# Altium PCB EMBL51537_SC_BOARD.PcbDoc (part 2 of 2)
Units mil, origin at the board's own origin, x right, y up, seen from the top; angles counter-clockwise.
Board outline 4527.6 x 6358.3 mil, 4 copper layers (TOP, L2_PWR, L3_GND, BOTTOM), stack 20.602 mil thick; 126 components, 64 nets, 342 pads, 137 vias.
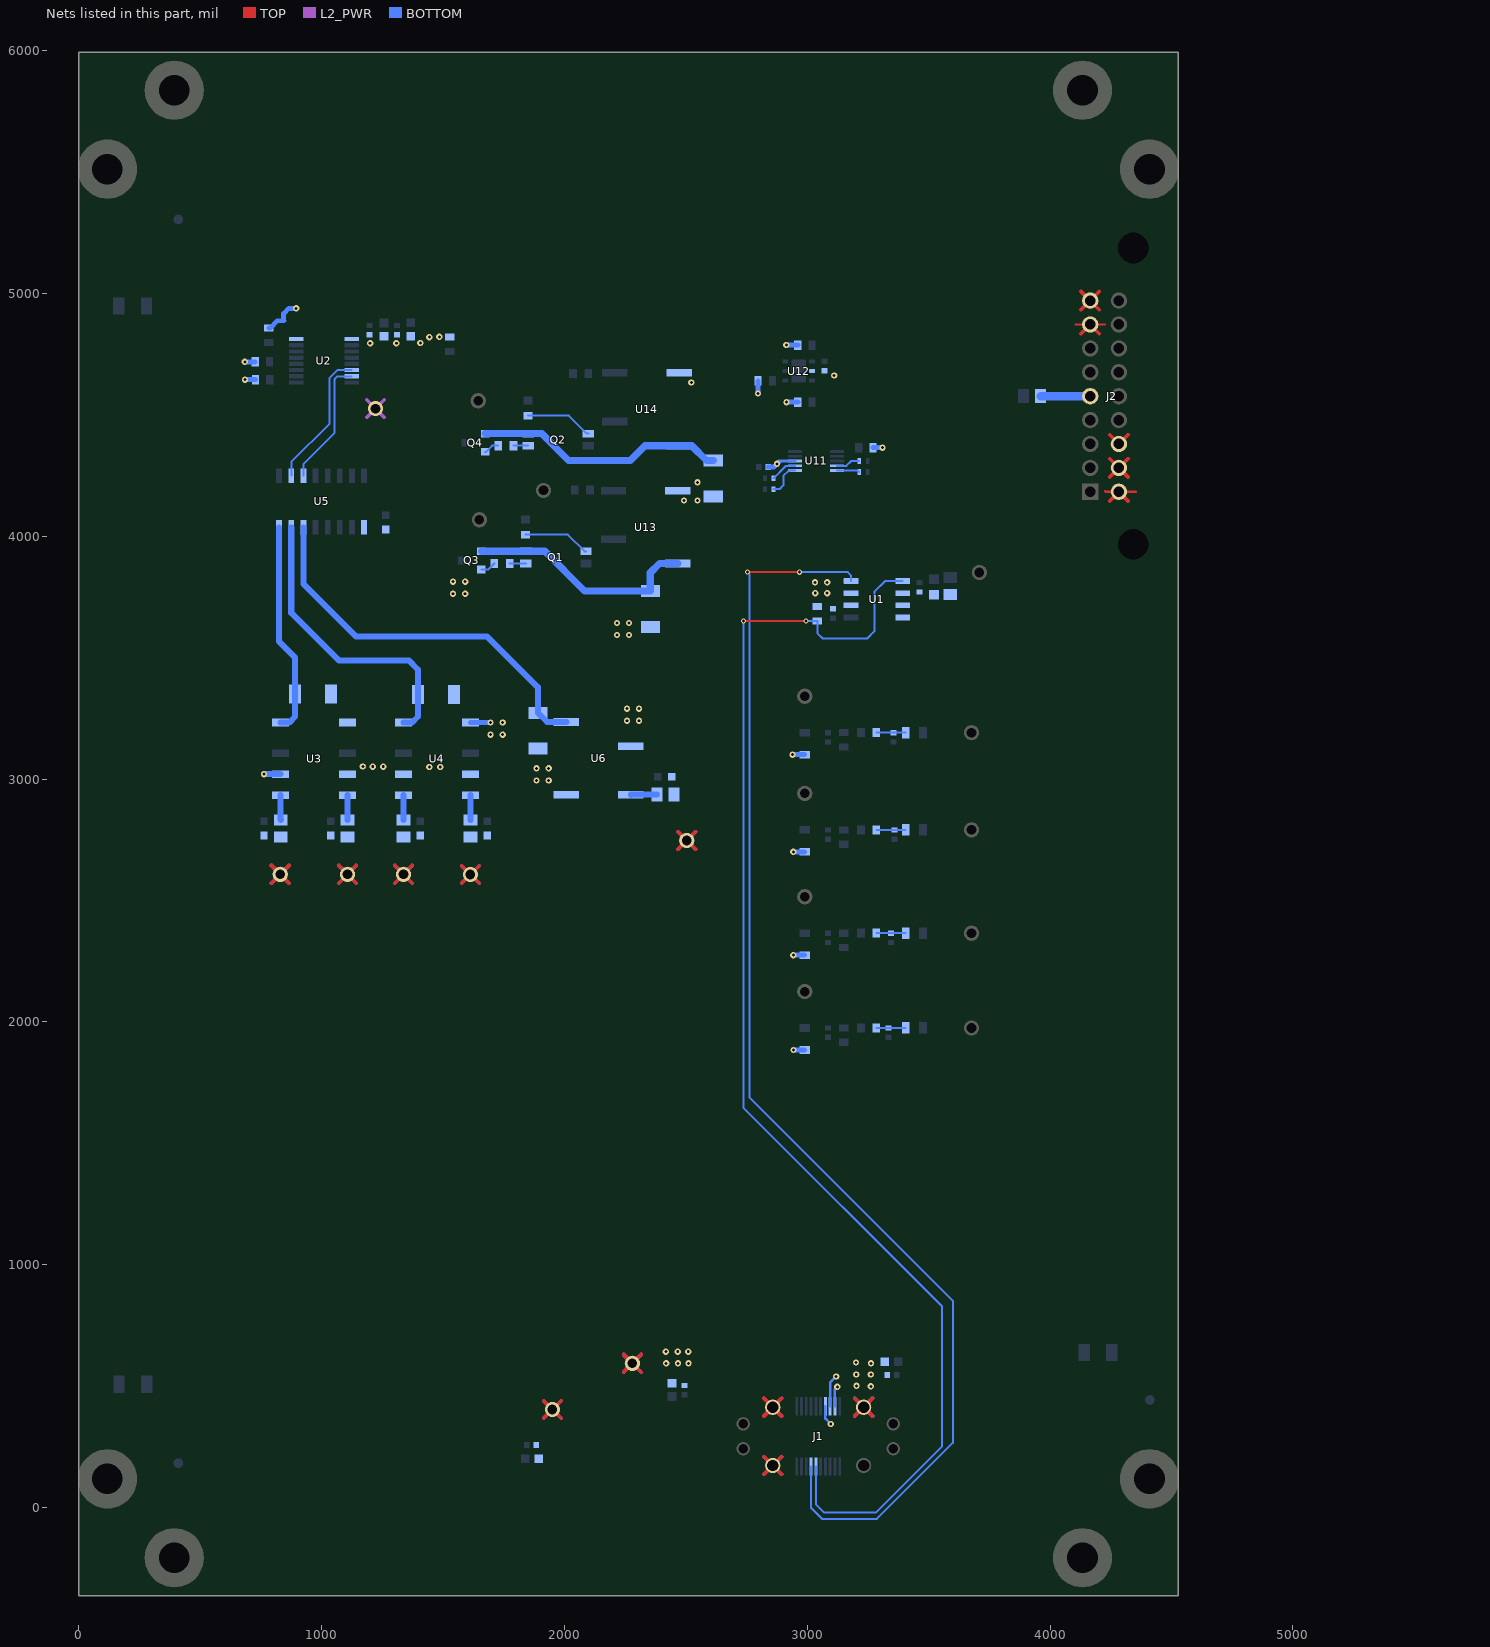
[diagram p4: the nets of this part, all layers, seen from the top]

## Via types
v1: diameter 24/26/26/24 (per signal layer), hole 12, TOP to BOTTOM, 110 vias
v2: diameter 20/22/22/20 (per signal layer), hole 12, TOP to BOTTOM, 27 vias

## Nets (pads, with @x,y where several pads share a name; then routed paths per layer and width w, separated by ;. In a path a pad name is that pad's centre, name@x,y a point inside that pad or via, vN(x,y) a via of type N, cw(c..) or ccw(c..) an arc to the next point about the centre after c; other vN are vias at no path point) (continued)
N03291: U2.6 U5.2 | length 573
  BOTTOM w8.26: U5.2@875.25,4249.4 875.25,4306.25 1033,4464 1033,4652.65 1064.71,4684.36 U2.6@1124.27,4684.36
N03295: U2.7 U5.3 | length 526.5
  BOTTOM w8.26: U5.3@925.25,4249.4 925.25,4296.9 1054,4425.65 1054,4647.65 1065.12,4658.77 U2.7@1124.27,4658.77
N06560: R14.1 U11.7 | length 109.9
  BOTTOM w8.26: R14.1@2861.47,4238.9 2912.78,4290.22 U11.7@2950.13,4290.22
N06575: R13.1 U11.6 | length 143.3
  BOTTOM w8.26: R13.1@2861.47,4193.9 2885.9,4193.9 2902,4210 2902,4249 2923.53,4270.53 U11.6@2950.13,4270.53
N06579: R12.1 U11.5 | length 93
  BOTTOM w8.26: U11.5@3123.36,4270.53 3208.4,4270.53 R12.1@3214.03,4264.9
N06583: R11.1 U11.4 | length 98.8
  BOTTOM w8.26: U11.4@3123.36,4290.22 3161.42,4290.22 3181.11,4309.9 R11.1@3214.03,4309.9
N07201: L26.1 U3.4 | length 101.1
  BOTTOM w25: L26.1@1106.9,2832.43 U3.4@1106.9,2933.49
N07205: L25.1 U3.5 | length 101.4
  BOTTOM w25: U3.5@831.32,2933.49 831.32,2833.22 L25.1@832.1,2832.43
N07536: L23.1 U4.4 | length 101.1
  BOTTOM w25: L23.1@1613.05,2832.43 U4.4@1613.05,2933.49
N07541: L24.1 U4.5 | length 101.1
  BOTTOM w25: L24.1@1337.46,2832.43 U4.5@1337.46,2933.49
N08317: L27.1 U6.4 | length 108.1
  BOTTOM w25: U6.4@2273.88,2935.1 2274.78,2936 L27.1@2381.57,2936
N13136: C2.1 C3.1 L22.1 U1.6 U1.7 U1.8
N15818: D22.2 Q1.4 Q3.2 U13.8 | length 967.7
  BOTTOM w30: Q3.2@1658.37,3937.75 Q1.4@1841.08,3937.75 1920.25,3937.75 2083.18,3774.82 D22.2@2354,3774.82 2354,3850 2391.75,3887.75 U13.8@2467.78,3887.75
N16558: Q1.1 R17.1 | length 277.4
  BOTTOM w8.26: R17.1@1840.1,4006.25 2014.75,4006.25 2083.25,3937.75 Q1.1@2089.11,3937.75
N17913: Q2.1 R19.1 | length 279.5
  BOTTOM w8.26: R19.1@1850.1,4496.25 2018.75,4496.25 2092.25,4422.75 Q2.1@2099.11,4422.75
N17917: D23.2 Q2.4 Q4.2 U14.8 | length 1036.1
  BOTTOM w30: Q4.2@1673.37,4422.75 Q2.4@1851.08,4422.75 1906.25,4422.75 2017.18,4311.82 2270.82,4311.82 2331.75,4372.75 U14.8@2472.78,4372.75 2524.25,4372.75 2585.18,4311.82 D23.2@2613,4311.82
N410547: C18.1 L18.2 R30.1 | length 121.2
  BOTTOM w8.26: R30.1@3284.59,3191.14 C18.1@3355.07,3191.14 L18.2@3405.78,3191.14
N411738: C20.1 L19.2 R32.1 | length 121.2
  BOTTOM w8.26: R32.1@3284.59,2790.75 C20.1@3360.07,2790.75 L19.2@3405.78,2790.75
N412167: C22.1 L20.2 R34.1 | length 121.2
  BOTTOM w8.26: R34.1@3284.59,2365.35 C22.1@3345.07,2365.35 L20.2@3405.78,2365.35
N412611: C24.1 L21.2 R36.1 | length 121.2
  BOTTOM w8.26: R36.1@3284.59,1974.96 C24.1@3335.07,1974.96 L21.2@3405.78,1974.96
N637569: J2.5 L16.2 | length 203.8
  BOTTOM w35: L16.2@3961.61,4576.81 J2.5@4165.39,4576.81
N652017: Q1.3 R38.2 | length 66.6
  BOTTOM w8.26: R38.2@1774.5,3887.75 Q1.3@1841.08,3887.75
N652047: Q2.3 R39.2 | length 60.6
  BOTTOM w8.26: R39.2@1790.5,4372.75 Q2.3@1851.08,4372.75
N652154: Q4.1 R39.1 | length 64.4
  BOTTOM w8.26: Q4.1@1673.37,4347.94 1677.94,4347.94 1702.75,4372.75 R39.1@1727.5,4372.75
N652754: Q3.1 R38.1 | length 63.4
  BOTTOM w8.26: Q3.1@1658.37,3862.94 1686.7,3862.94 R38.1@1711.5,3887.75
RELAY1_OUT1: C26.2 J2.9 L26.2 TP5.1 | length 624.5
  TOP w15: 1070.61,2571.21 TP5.1@1106.9,2607.5 ; 1070.61,2643.79 TP5.1@1106.9,2607.5 ; 1143.2,2571.21 TP5.1@1106.9,2607.5 ; 1143.2,2643.79 TP5.1@1106.9,2607.5 ; 4127.57,4932.69 J2.9@4165.39,4970.51 ; 4127.57,5008.33 J2.9@4165.39,4970.51 ; 4203.21,4932.69 J2.9@4165.39,4970.51 ; 4203.21,5008.33 J2.9@4165.39,4970.51
  BOTTOM w15: 1070.61,2571.21 TP5.1@1106.9,2607.5 ; 1070.61,2643.79 TP5.1@1106.9,2607.5 ; 1143.2,2571.21 TP5.1@1106.9,2607.5 ; 1143.2,2643.79 TP5.1@1106.9,2607.5
RELAY1_OUT2: C27.2 J2.10 L25.2 TP8.1 | length 644.4
  TOP w10: 4228,4185 4229.89,4183.11 J2.10@4283.5,4183.11 4353.89,4183.11 4354,4183
  TOP w15: 793.81,2571.21 TP8.1@830.1,2607.5 ; 793.81,2643.79 TP8.1@830.1,2607.5 ; 866.4,2571.21 TP8.1@830.1,2607.5 ; 866.4,2643.79 TP8.1@830.1,2607.5 ; 4245.69,4145.29 J2.10@4283.5,4183.11 4321.32,4145.29
  BOTTOM w15: 793.81,2571.21 TP8.1@830.1,2607.5 ; 793.81,2643.79 TP8.1@830.1,2607.5 ; 866.4,2571.21 TP8.1@830.1,2607.5 ; 866.4,2643.79 TP8.1@830.1,2607.5
RELAY2_OUT1: C15.2 J2.11 L23.2 TP6.1 | length 624.5
  TOP w15: 1576.75,2570.67 TP6.1@1613.05,2606.96 ; 1576.75,2643.25 TP6.1@1613.05,2606.96 ; 1649.34,2570.67 TP6.1@1613.05,2606.96 ; 1649.34,2643.25 TP6.1@1613.05,2606.96 ; 4245.69,4243.72 J2.11@4283.5,4281.53 ; 4245.69,4319.35 J2.11@4283.5,4281.53 ; 4321.32,4243.72 J2.11@4283.5,4281.53 ; 4321.32,4319.35 J2.11@4283.5,4281.53
  BOTTOM w15: 1576.75,2570.67 TP6.1@1613.05,2606.96 ; 1576.75,2643.25 TP6.1@1613.05,2606.96 ; 1649.34,2570.67 TP6.1@1613.05,2606.96 ; 1649.34,2643.25 TP6.1@1613.05,2606.96
RELAY2_OUT2: C16.2 J2.12 L24.2 TP9.1 | length 517.6
  TOP w15: 1301.16,2571.21 TP9.1@1337.46,2607.5 ; 1301.16,2643.79 TP9.1@1337.46,2607.5 ; 1373.75,2571.21 TP9.1@1337.46,2607.5 ; 1373.75,2643.79 TP9.1@1337.46,2607.5 ; 4245.69,4417.78 J2.12@4283.5,4379.96 4321.32,4417.78
  BOTTOM w15: 1301.16,2571.21 TP9.1@1337.46,2607.5 ; 1301.16,2643.79 TP9.1@1337.46,2607.5 ; 1373.75,2571.21 TP9.1@1337.46,2607.5 ; 1373.75,2643.79 TP9.1@1337.46,2607.5
RELAY3_OUT1: C17.2 J2.8 L27.2 TP7.1 | length 637.6
  TOP w10: 4106,4872 4106.09,4872.09 J2.8@4165.39,4872.09 4225.91,4872.09 4226,4872
  TOP w15: 2467.58,2710.8 TP7.1@2503.87,2747.1 ; 2467.58,2783.39 TP7.1@2503.87,2747.1 ; 2540.17,2710.8 TP7.1@2503.87,2747.1 ; 2540.17,2783.39 TP7.1@2503.87,2747.1 ; 4127.57,4834.27 J2.8@4165.39,4872.09 4203.21,4834.27
  BOTTOM w15: 2467.58,2710.8 TP7.1@2503.87,2747.1 ; 2467.58,2783.39 TP7.1@2503.87,2747.1 ; 2540.17,2710.8 TP7.1@2503.87,2747.1 ; 2540.17,2783.39 TP7.1@2503.87,2747.1
RELAY_1: D24.2 U3.8 U5.16 | length 876.6
  BOTTOM w25: U5.16@825.25,4036.8 825.25,3566.11 891.18,3500.18 D24.2@891.18,3351 891.18,3257.7 866.18,3232.7 U3.8@831.32,3232.7
RELAY_2: D25.2 U4.8 U5.15 | length 1234.2
  BOTTOM w25: U5.15@875.25,4036.8 875.25,3684.75 1071,3489 1359.18,3489 1397.18,3451 D25.2@1397.18,3348 1397.18,3257.7 1372.18,3232.7 U4.8@1337.46,3232.7
RELAY_3: D26.2 U5.14 U6.8 | length 1613.5
  BOTTOM w25: U5.14@925.25,4036.8 925.25,3803.75 1141,3588 1681,3588 1891,3378 D26.2@1891,3272.82 1928.72,3235.1 U6.8@2008.53,3235.1
USB_EN: J1.17 U1.4 | length 5296.5
  TOP w8.26: v2(2754,3853) 2967,3853 v2(2968,3852)
  BOTTOM w8.26: v2(2754,3853) 2761.55,3845.45 2761.55,1689.45 3600,851 3600,266 3287,-47 3061,-47 3015.8,-1.8 J1.17@3015.8,169.28 ; v2(2968,3852) 3167,3852 3180.8,3838.2 U1.4@3180.8,3815.75
USB_OC: J1.16 R1.2 U1.5 | length 5451.3
  TOP w8.26: v2(2737.42,3651) 2995,3651 v2(2995.22,3651.22)
  BOTTOM w8.26: v2(2737.42,3651) 2737.42,1646.58 3556,828 3556,252 3283,-21 3070,-21 3035.49,13.51 J1.16@3035.49,169.28 ; v2(2995.22,3651.22) R1.2@3042.1,3651.22 3042.1,3600.9 3064,3579 3248,3579 3277,3608 3277,3772 3320.75,3815.75 U1.5@3393.4,3815.75
VDD1: C6.2 C9.1 C10.1 D22.1 D23.1 D24.1 D25.1 D26.1 J1.2 J1.P4 TP3.1 U3.1 U4.1 U5.9 U6.2 U6.5 U13.5 U14.5 | length 905
  TOP w15: 1914.45,367.61 TP3.1@1950.75,403.9 ; 1914.45,440.19 TP3.1@1950.75,403.9 ; 1987.04,367.61 TP3.1@1950.75,403.9 ; 1987.04,440.19 TP3.1@1950.75,403.9 ; 2822.03,136.92 J1.P4@2858.32,173.22 ; 2822.03,209.51 J1.P4@2858.32,173.22 ; 2894.61,136.92 J1.P4@2858.32,173.22 ; 2894.61,209.51 J1.P4@2858.32,173.22
  BOTTOM w10: J1.2@3114.22,417.31 3114.22,463 ; 3114.23,463 3114.23,487.23 v1(3124,497)
  BOTTOM w15: 1914.45,367.61 TP3.1@1950.75,403.9 ; 1914.45,440.19 TP3.1@1950.75,403.9 ; 1987.04,367.61 TP3.1@1950.75,403.9 ; 1987.04,440.19 TP3.1@1950.75,403.9 ; 2822.03,136.92 J1.P4@2858.32,173.22 ; 2822.03,209.51 J1.P4@2858.32,173.22 ; 2894.61,136.92 J1.P4@2858.32,173.22 ; 2894.61,209.51 J1.P4@2858.32,173.22
  other v1: 1885.17,2994.1 1935.17,2994.1 1885.17,3044.1 1935.17,3044.1 1696,3182.7 1746,3182.7 1696,3232.7 1746,3232.7 2257.52,3240.1 2307.52,3240.1 2257.52,3290.1 2307.52,3290.1 2216.52,3593.1 2266.52,3593.1 2216.52,3643.1 2266.52,3643.1 1541.52,3763.1 1591.52,3763.1 1541.52,3813.1 1591.52,3813.1 2493,4147 2548,4147 2548,4222 2523,4633
VDD2: C1.1 C11.1 C12.1 J1.3 J1.P2 R1.1 TP2.1 U1.2 U1.3 U3.3 U4.3 U4.6 | length 1159.3
  TOP w15: 2243.8,557.46 TP2.1@2280.1,593.75 ; 2243.8,630.04 TP2.1@2280.1,593.75 ; 2316.39,557.46 TP2.1@2280.1,593.75 ; 2316.39,630.04 TP2.1@2280.1,593.75 ; 2822.03,377.08 J1.P2@2858.32,413.37 ; 2822.03,449.67 J1.P2@2858.32,413.37 ; 2894.61,377.08 J1.P2@2858.32,413.37 ; 2894.61,449.67 J1.P2@2858.32,413.37
  L2_PWR w15: 2243.8,557.46 TP2.1@2280.1,593.75 ; 2243.8,630.04 TP2.1@2280.1,593.75 ; 2316.39,557.46 TP2.1@2280.1,593.75 ; 2316.39,630.04 TP2.1@2280.1,593.75 ; 2822.03,377.08 J1.P2@2858.32,413.37 ; 2822.03,449.67 J1.P2@2858.32,413.37 ; 2894.61,377.08 J1.P2@2858.32,413.37 ; 2894.61,449.67 J1.P2@2858.32,413.37
  BOTTOM w10: J1.3@3094.54,417.31 3094.54,440 3094.54,515.54 v1(3119,540)
  BOTTOM w15: 2243.8,557.46 TP2.1@2280.1,593.75 ; 2243.8,630.04 TP2.1@2280.1,593.75 ; 2316.39,557.46 TP2.1@2280.1,593.75 ; 2316.39,630.04 TP2.1@2280.1,593.75
  other v1: 2419,594 2468,594 2511,594 2418.1,642 2467,642 2510,642 1443.99,3050 1489,3050 1210.99,3051 1254,3051 1170,3052 3033.25,3765.75 3082,3765.75 3032,3810 3082,3810
VDD3: C4.1 C5.1 C7.1 C8.1 C13.1 C14.1 C33.1 C34.1 D18.2 D19.2 D20.2 D21.2 J1.4 J1.P1 R2.1 R3.1 R8.1 R9.1 R10.1 R15.2 R28.1 R29.1 TP4.1 U2.1 U2.16 U3.6 U11.8 U12.5 | length 1720.4
  TOP w15: 3196.04,377.08 J1.P1@3232.34,413.37 ; 3196.04,449.67 J1.P1@3232.34,413.37 ; 3268.63,377.08 J1.P1@3232.34,413.37 ; 3268.63,449.67 J1.P1@3232.34,413.37
  L2_PWR w15: 1185.81,4489.45 TP4.1@1222.1,4525.75 ; 1185.81,4562.04 TP4.1@1222.1,4525.75 ; 1258.39,4489.45 TP4.1@1222.1,4525.75 ; 1258.39,4562.04 TP4.1@1222.1,4525.75 ; 3196.04,377.08 J1.P1@3232.34,413.37 ; 3196.04,449.67 J1.P1@3232.34,413.37 ; 3268.63,377.08 J1.P1@3232.34,413.37 ; 3268.63,449.67 J1.P1@3232.34,413.37
  BOTTOM w10: J1.4@3074.86,417.31 3074.86,397 3074.86,366.14 v1(3097,344)
  BOTTOM w12: v1@2883.5,4305.5 2887.9,4309.9 U11.8@2950.13,4309.9
  BOTTOM w15: 3196.04,377.08 J1.P1@3232.34,413.37 ; 3196.04,449.67 J1.P1@3232.34,413.37 ; 3268.63,377.08 J1.P1@3232.34,413.37 ; 3268.63,449.67 J1.P1@3232.34,413.37
  BOTTOM w20: v1(684,4718.04) R2.1@726.72,4718.04 ; v1(685,4645.1) R28.1@727.72,4645.1 ; R3.1@782.99,4857.28 787.91,4857.28 818.23,4887.6 844.95,4887.6 843.75,4888.79 843.75,4917.08 864.95,4938.28 v1(895.63,4938.28) ; v1(2797.37,4588) R8.1@2797.37,4640.25 ; C7.1@2839.29,4285 2863,4285 v1(2876,4298) v1@2883.5,4305.5 ; v1(2913.9,4787.25) R15.2@2961.37,4787.25 ; v1(2915,4552.25) R9.1@2961.37,4552.25 ; v1(2939.26,3100.59) D18.2@2990.15,3100.59 ; v1(2943,2700.2) D19.2@2990.15,2700.2 ; v1(2943.15,2274.8) D20.2@2990.14,2274.8 ; v1(2943.44,1884.41) D21.2@2990.15,1884.41 ; R10.1@3271.28,4364.9 v1(3310.04,4364.9)
  BOTTOM w25: v1(763,3020.11) U3.6@831.32,3020.11
  other v1: 3262,499 3203,501 3202,548 3262,548 3263,594 3201,597 3111,4662 1200,4794.63 1308,4794.88 1406.66,4796 1444.04,4820.09 1485.03,4821
pads on no net: 40T_GLOBAL_FID. J1.18 J1.19 J1.20 J2. J2.13 U2.4 U2.9 U2.10 U2.11 U2.12 U3.2 U3.7 U4.2 U4.7 U5.4 U5.5 U5.6 U5.7 U5.10 U5.11 U5.12 U5.13

## Polygon pours and split planes (outlines as drawn)
GND on TOP "TOP-GND" (solid, pour order 40): 658,5659 3952,5659 4242.01,5368.99 4242.01,5044.99 4418,4869 4418,4673 4326,4673 4326,4611 4195,4611 4195,4537 4326,4537 4326,4065 4263,4065 4147,3949 4147,3948 4287,3948 4397,3838 4397,2116 4190,1909 4190,466 4008,284 3589,284 3404.87,99.87 3153.85,99.87 3120.92,66.94 ccw(c3123.75,64.11) 3122.71,60.25 cw(c3117,39) 3139,39 cw(c3117,39) 3117,17 cw(c3117,39) 3095.75,33.29 ccw(c3091.89,32.25) 3089.06,35.08 3082.75,28.76 3082.63,28.16 cw(c3063,32) 3043,32.1 ccw(c3039,32.13) 3036.17,34.95 3014.04,12.83 ccw(c3016.87,10) 3016.75,6 3024,4 3010,4 665,6 249,422 249,5250
VDD1 on TOP "TOP-VDD1" (solid, pour order 27): 3141,509 2960,509 2939.5,488.5 2939.5,359 2924.5,344 2791,344 2784,337 2784,238 2784,201 2774,191 2125,191 2118,198 2118,500 2090,528 1916,528 1891,503 1871,483 1871,96 1949,18 2998,18 3028,48 3028,73 3028,109 3028,140 3028,435 3039,446 3136,446 3146,456 3146,477 3146,504
VDD2 on TOP "TOP-VDD2" (solid, pour order 26): 2944,523 3129,523 3137,531 3137,559 3130,566 3016,566 2953,629 2899,683 2229,683 2193,647 2193,461 2255,399 2758,399 2788,369 2797,360 2912,360 2926,374 2926,505
GND on TOP "TOP-GND 1" (solid, pour order 42): 20,-344.17 20,5974.13 4507.6,5974.13 4507.6,-344.17
RELAY3_OUT1 on TOP "TOP-RELAY3_OUT1" (solid, pour order 29): 4225,4910 2621,4910 2366,4655 2366,2690 2403,2653 2568,2653 2634,2719 2634,4645 2807,4818 4224,4818 4240,4834 4240,4895
RELAY2_OUT2 on TOP "TOP-RELAY2_OUT2" (solid, pour order 30): 1297,2519 1487,2519 1507,2539 1507,2659 1538,2690 1868,2690 1930,2628 1930,2514 2004,2440 2026,2418 3154,2418 3264,2528 3264,4000 3660,4396 4203,4396 4252,4347 4352,4347 4371,4366 4371,4506 4350,4527 3520,4527 3060,4067 3060,2672 2993,2605 2641,2605 2335,2605 2259,2681 2259,2763 2217,2805 1347,2805 1277,2735 1277,2539
RELAY1_OUT1 on TOP "TOP-RELAY1_OUT1" (solid, pour order 32): 4190,5055 2145,5055 1961,4871 1961,3811 1961,3143 1810,2992 996,2992 957,2953 957,2652 957,2577 1025,2509 1144,2509 1189,2554 1189,2661 1189,2810 1218,2839 2111,2839 2252,2980 2252,4805 2364,4917 4206,4917 4230,4941 4230,5015
RELAY1_OUT2 on TOP "TOP-RELAY1_OUT2" (solid, pour order 34): 1094,1569 3992,1569 4084,1661 4084,3896 4258,4070 4341,4070 4370,4099 4370,4212 4360,4222 4253,4222 4227,4222 4220,4215 4220,4150 4202,4132 3898,4132 3834,4068 3834,1970 3708,1844 1208,1844 910,2142 910,2678 879.5,2708.5 789.5,2708.5 757,2676 757,1906
VDD3 on TOP "TOP-VDD3" (solid, pour order 24): 3169,457 3147,435 3056,435 3040,419 3040,324 3051,313 3070,313 3277,313 3298,334 3342,378 3342,500 3342,750 3321,771 3187,771 3169,753
RELAY2_OUT1 on TOP "TOP-RELAY2_OUT1" (solid, pour order 31): 1540,2647 1540,2363 1703,2200 3009,2200 3011,2198 3482,2198 3603,2319 3603,3971 3860,4228 4359,4228 4367,4236 4367,4325 4355,4337 3706,4337 3373,4004 3373,2440 3310,2377 2829,2377 2002,2377 1886,2493 1886,2613 1828,2671 1564,2671
GND on L3_GND "L3_GND-GND" (solid, pour order 43): 20,-344.17 20,5974.13 4507.6,5974.13 4507.6,-344.17
GND on L3_GND "L3_GND-GND 1" (solid, pour order 39): 628,5629 3581,5629 4023,5629 4341,5311 4341,5061 4371,5031 4371,4155 4190,3974 4190,309 3887,6 586,6 249,343 249,5250
GND on BOTTOM "BOTTOM-GND" (solid, pour order 5): 3065.1,2337.75 3364.1,2337.75 3367.1,2334.75 3367.1,2293.75 3359.1,2285.75 3066.1,2285.75 3059.1,2292.75 3059.1,2331.75
GND on BOTTOM "BOTTOM-GND 1" (solid, pour order 14): 1358.25,4188.75 1372,4188.75 1377.37,4183.37 1377.37,4076.37 1368,4067 1246,4067 1237.25,4075.75 1237.25,4119 1159,4197.25 1159,4285 1172,4298 1249,4298
HV_GND on BOTTOM "BOTTOM-HV_GND" (solid, pour order 28): 1652,4244 2272.75,4244 2285.87,4230.87 2285.87,4112 2267.87,4094 2062.75,4094 2043,4113.75 1842,4113.75 1841.87,4113.87 1494.13,4113.87 1380,4228 1380,4597 1514.5,4731.5 1622,4731.5 1836.5,4946 3823,4946 3920,4849 3920,4737 3920,4550 3910,4540 3862,4540 3853,4549 3853,4793 3791,4855 2355,4855 2285,4785 2285,4635 2261,4611 1618,4611 1561,4554 1561,4335
VDD1 on BOTTOM "BOTTOM-VDD1" (solid, pour order 10): 2593,4716 2451,4716 2418,4716 2401,4699 2401,4617 2414,4604 2458,4604 2459,4605 2584,4605 2610,4631 2610,4682 2610,4699
VDD2 on BOTTOM "BOTTOM-VDD2" (solid, pour order 20): 1632,3066 1010,3066 996,3052 996,3002 1003,2995 1656,2995 1665,3004 1665,3033 1664.5,3033.5 1664.5,3058.5 1657,3066
VDD1 on BOTTOM "BOTTOM-VDD1 1" (solid, pour order 13): 2529,4240 2387,4240 2372,4225 2372,4152 2395,4129 2520,4129 2656,4129 2662,4135 2662,4231 2653,4240
GND on BOTTOM "BOTTOM-GND 2" (solid, pour order 44): 20,5974.13 4507.6,5974.13 4507.6,-344.17 20,-344.17
GND on BOTTOM "BOTTOM-GND 3" (solid, pour order 1): 2994,4632 2994,4730 2988,4736 2896,4736 2888,4728 2888,4672 2894,4666 2926,4666 2933,4659 2933,4633 2936,4630 2992,4630
VDD3 on BOTTOM "BOTTOM-VDD3" (solid, pour order 0): 3009.9,4694.25 3007.9,4692.25 3007.9,4665.25 3012.9,4660.25 3043,4660.25 3055.25,4648 3120,4648 3125,4653 3125,4691 3121.75,4694.25
RELAY3_OUT1 on BOTTOM "BOTTOM-RELAY3_OUT1" (solid, pour order 21): 2425.18,2799.82 2425.18,3023.19 2434.18,3032.19 2510.18,3032.19 2510.18,3032.18 2589.82,3032.18 2603,3019 2603,2808 2602.5,2807.5 2602.5,2653.5 2580,2631 2449,2631 2425.18,2654.82
GND on BOTTOM "BOTTOM-GND 4" (solid, pour order 41): 4190,1909 4190,309 3887,6 586,6 447.95,144.05 ccw(c410.1,182.75) 371.4,220.6 249,343 249,5250 658,5659 3628,5659 3952,5659 4242.01,5368.99 4242.01,5044.99 4418,4869 4418,4125 4264,3971 4397,3838 4397,2116
VDD3 on BOTTOM "BOTTOM-VDD3 1" (solid, pour order 22): 3341.25,621.75 3341.25,532.1 3341.08,531.92 3341.08,427.08 3271,357 3187,357 3159,385 3159,772 3167,780 3307,780 3341,746 3341.25,745.75
VDD3 on BOTTOM "BOTTOM-VDD3 2" (solid, pour order 12): 1091.17,4803.67 1093.1,4801.75 1167,4801.75 1184.75,4784 1466,4784 1482,4800 1565,4800 1572,4807 1572,4842 1562,4852 1422,4852 1412.75,4842.75 1135,4842.75 1134.63,4842.37 1103.72,4842.37 1091.17,4829.82
GND on BOTTOM "BOTTOM-GND 5" (solid, pour order 6): 3065.1,3163.75 3370.1,3163.75 3373.1,3160.75 3373.1,3116.75 3368.1,3111.75 3064.1,3111.75 3061.1,3114.75 3061.1,3159.75
GND on BOTTOM "BOTTOM-GND 6" (solid, pour order 3): 3445,3910.75 3542,3910.75 3547.75,3905 3548,3905 3548,3803 3541.5,3796.5 3442.5,3796.5 3439,3800 3439,3873 3439,3904.75
RELAY2_OUT1 on BOTTOM "BOTTOM-RELAY2_OUT1" (solid, pour order 18): 1551.18,2552.82 1551.18,2776.19 1560.18,2785.19 1636.18,2785.19 1636.18,2785.18 1715.82,2785.18 1729,2772 1729,2561 1706,2538 1566,2538
"+5V USB" on BOTTOM "BOTTOM-+5V USB" (solid, pour order 25): 3569.85,3806 3565.6,3810.25 3565.6,3927.97 3565.6,4270.6 3620,4325 4202,4325 4217,4310 4217,4255 4196,4234 3856,4234 3791.68,4169.68 3791.68,3915.07 3791.68,3804.68 3769,3782 3658,3782 3634,3806
N13136 on BOTTOM "BOTTOM-N13136" (solid, pour order 15): 3349.44,3782.09 3624.1,3782.09 3624.1,3670.75 3599.1,3645.75 3356.1,3645.75 3344.1,3657.75 3344.1,3776.75
VDD3 on BOTTOM "BOTTOM-VDD3 3" (solid, pour order 8): 954,4970 861,4970 822,4931 822,4808 831,4799 925,4799 930,4804 930,4820 905,4845 905,4908 914,4917 957,4917 965,4925 965,4959
GND on BOTTOM "BOTTOM-GND 7" (solid, pour order 4): 3062.1,1946.75 3357.1,1946.75 3361.1,1942.75 3361.1,1899.75 3356.1,1894.75 3061.1,1894.75 3055.1,1900.75 3055.1,1939.75
VDD2 on BOTTOM "BOTTOM-VDD2 1" (solid, pour order 23): 2252.05,492.95 2252.1,493 2526,493 2539.95,506.95 2544,511 2544,659 2544,699 2527,716 2178,716 2160,698 2160,690 2160,513 2180.05,492.95
GND on BOTTOM "BOTTOM-GND 8" (solid, pour order 7): 3057.1,2762.75 3374.1,2762.75 3378.1,2758.75 3378.1,2717.75 3371.1,2710.75 3055.1,2710.75 3052.1,2713.75 3052.1,2757.75
RELAY1_OUT2 on BOTTOM "BOTTOM-RELAY1_OUT2" (solid, pour order 17): 747.18,2555.82 747.18,2779.19 756.18,2788.19 832.18,2788.19 832.18,2788.18 911.82,2788.18 925,2775 925,2564 902,2541 762,2541
RELAY2_OUT2 on BOTTOM "BOTTOM-RELAY2_OUT2" (solid, pour order 19): 1267.18,2553.82 1267.18,2777.19 1276.18,2786.19 1352.18,2786.19 1352.18,2786.18 1431.82,2786.18 1445,2773 1445,2562 1422,2539 1282,2539
RELAY1_OUT1 on BOTTOM "BOTTOM-RELAY1_OUT1" (solid, pour order 16): 999.18,2562.82 999.18,2786.19 1008.18,2795.19 1084.18,2795.19 1084.18,2795.18 1163.82,2795.18 1177,2782 1177,2571 1154,2548 1014,2548
VDD1 on BOTTOM "BOTTOM-VDD1 2" (solid, pour order 33): 1971,15 1870,116 1870,3028 1750,3148 987,3148 965,3170 965,3392 995,3422 1176,3422 1234,3364 1234,3234 1266,3202 1476,3202 1502,3228 1502,3386 1514,3398 1514,3398.5 1640,3398.5 1640.5,3399 1775,3399 1806,3368 1806,3220 1853,3173 2078,3173 2108,3203 2108,3440 1928,3620 1191,3620 1163,3648 1163,4070 1170,4077 1206,4077 1234,4049 1500,4049 1517,4032 1517,3862 1549,3830 1978,3830 2145,3663 2405,3663 2422,3646 2422,3109 2404,3091 2211,3091 2142,3022 2142,185 2233,94 2772,94 2796,118 2796,220 2821,245 2906,245 2932,219 2932,68 2879,15
GND on BOTTOM "BOTTOM-GND 9" (solid, pour order 9): 1230.35,4954 1394,4954 1412,4936 1412,4875 1393,4856 1177.85,4856 1177.1,4856.75 1177.1,4900.75
GND on BOTTOM "BOTTOM-GND 10" (solid, pour order 2): 3140,3677.75 3221,3677.75 3226.37,3672.37 3226.37,3606 3089.25,3606 3086.25,3609 3086.25,3668 3091.25,3673 3130,3673 3135.25,3673
VDD2 on BOTTOM "BOTTOM-VDD2 2" (solid, pour order 11): 3216.1,3782.75 3141,3782.75 3129,3794.75 3129,3828 3121,3836 3016,3836 3008.1,3828.1 3008.1,3761.75 3008.1,3700.75 3019.1,3689.75 3209.1,3689.75 3223.1,3703.75 3223.1,3775.75
12V_START1 on L2_PWR "L2_PWR-12V_START1" (solid, pour order 36): 3776,3588 3776,4688 3817,4729 4207,4729 4231,4705 4231,4634 4211,4614 4107,4614 4074,4581 4074,916 4074,529 3821.5,276.5 3599.5,276.5 3553,230 3553,-16 3495,-74 3118,-74 3082,-38 3082,30 3356,304 3356,3168
VDD3 on L2_PWR "L2_PWR-VDD3" (solid, pour order 38): 560,5676 3290,5676 3669,5297 3669,3622 3337,3290 3337,316 2924,-97 1219,-97 337,785 337,5453
VDD1 on L2_PWR "L2_PWR-VDD1" (solid, pour order 35): 1535,3008 1579,2964 2408,2964 2577,3133 2577,4836 2487,4926 2431,4926 2430,4925 1642.44,4925 1602.44,4885 1535,4817.56
VDD2 on L2_PWR "L2_PWR-VDD2" (solid, pour order 37): 1497,3083 955,3083 938,3066 938,848 1328,458 2674,458 2775,357 2959,357 3137,535 3137,1753 3077,1813 2897,1813 2872,1838 2872,3148 3152,3428 3152,3969 3123,3998 2626,3998 2610,3982 2610,3127 2420,2937 1564,2937 1514,2987 1514,3066

## Keep-outs
BOTTOM:
  region: 3560,-354 3963,-354 3963,158.94 3560,158.94
Multi-Layer:
  region: 3561,-354 3963,-354 3963,158.94 3561,158.94
  region: 1826.92,5136 3913.54,5136 3913.54,6001 1826.92,6001
  region: 3674.93,50.66 3674.93,-9.32 3772.64,-9.32 3772.64,50.55 3766.97,50.55 3766.8,50.72 3766.8,157.62 3765.07,159.35 3682.21,159.35 3680.85,157.99 3680.85,50.74 3680.77,50.66

## Other copper
TOP:
  region net CHASSIS_GND: 4179.52,5974.13 4507.6,5974.13 4507.6,5616.93 cw(c4503.6,5616.93) 4500.93,5613.95 ccw(c4409.5,5511.86) 4409.5,5648.91 ccw(c4409.5,5511.86) 4409.5,5374.81 ccw(c4409.5,5511.86) 4500.93,5409.77 cw(c4503.6,5406.79) 4507.6,5406.79 4507.6,223.17 cw(c4503.6,223.17) 4500.93,220.19 ccw(c4409.5,118.1) 4409.5,255.15 ccw(c4409.5,118.1) 4409.5,-18.95 ccw(c4409.5,118.1) 4500.93,16 cw(c4503.6,13.03) 4507.6,13.03 4507.6,-344.17 4179.52,-344.17 cw(c4179.52,-340.17) 4178.23,-336.39 ccw(c4133.91,-206.7) 4270.96,-206.7 ccw(c4133.91,-206.7) 3996.86,-206.7 ccw(c4133.91,-206.7) 4089.59,-336.39 cw(c4088.29,-340.17) 4088.29,-344.17 3963,-344.17 3963,158.94 3765.48,158.94 3765.07,159.35 3682.21,159.35 3681.8,158.94 3561,158.94 3561,-344.17 439.3,-344.17 cw(c439.3,-340.17) 438.01,-336.39 ccw(c393.69,-206.7) 530.74,-206.7 ccw(c393.69,-206.7) 256.64,-206.7 ccw(c393.69,-206.7) 349.37,-336.39 cw(c348.07,-340.17) 348.07,-344.17 20,-344.17 20,13.03 cw(c24,13.03) 26.67,16 ccw(c118.1,118.1) 118.1,-18.95 ccw(c118.1,118.1) 118.1,255.15 ccw(c118.1,118.1) 26.67,220.19 cw(c24,223.17) 20,223.17 20,5406.79 cw(c24,5406.79) 26.67,5409.77 ccw(c118.1,5511.86) 118.1,5374.81 ccw(c118.1,5511.86) 118.1,5648.91 ccw(c118.1,5511.86) 26.67,5613.95 cw(c24,5616.93) 20,5616.93 20,5974.13 348.07,5974.13 cw(c348.07,5970.13) 349.37,5966.34 ccw(c393.69,5836.66) 256.64,5836.66 ccw(c393.69,5836.66) 530.74,5836.66 ccw(c393.69,5836.66) 438.01,5966.34 cw(c439.3,5970.13) 439.3,5974.13 1826.92,5974.13 1826.92,5687.28 646.28,5687.28 220.72,5261.72 220.72,410.29 653.27,-22.27 3009.99,-24.28 3024,-24.28 3026.68,-4.47 cw(c3028.67,-4.74) 3030.03,-3.28 ccw(c3063,32) 3085.61,-10.66 ccw(c3100.62,5.42) 3100.62,-16.58 ccw(c3100.62,5.42) 3114.98,-11.24 ccw(c3116.99,39) 3117,-11.28 ccw(c3117,39) 3167.28,39 ccw(c3117,39) 3159.64,65.66 3165.57,71.59 3416.58,71.59 3600.72,255.72 4019.72,255.72 4040.86,276.87 4041,276.87 ccw(c4041,291) 4050.99,281.01 4201.99,432.01 ccw(c4192,442) 4206.13,442 4206.13,442.13 4218.28,454.29 4218.28,1897.29 4425.28,2104.28 4425.28,3509.3 4443.99,3528.01 ccw(c4434,3538) 4448.13,3538 4448.13,4526 ccw(c4434,4526) 4443.99,4535.99 4354.28,4625.7 4354.28,4644.72 4446.28,4644.72 4446.28,4880.72 4270.3,5056.7 4270.3,5167.71 ccw(c4342.56,5187.05) 4270.3,5206.38 4270.3,5380.7 3963.72,5687.28 3913.54,5687.28 3913.54,5974.13 4088.29,5974.13 cw(c4088.29,5970.13) 4089.59,5966.34 ccw(c4133.91,5836.66) 3996.86,5836.66 ccw(c4133.91,5836.66) 4270.96,5836.66 ccw(c4133.91,5836.66) 4178.23,5966.34 cw(c4179.52,5970.13)
  text "L1" at 4026,5421.5 h35
L2_PWR:
  text "L2" at 4026,5421.5 h35
L3_GND:
  region net CHASSIS_GND: 13 vertices and 4 holes, not listed, extent 20,-344.17 3561,5974.13
  region net CHASSIS_GND: 19 vertices and 4 holes, not listed, extent 3913.54,-344.17 4507.6,5974.13
  text "L3" at 4026,5421.5 h35
BOTTOM:
  pour cut-out: 400,5548 578,5726 3951,5726 4215,5462 4215,5459 4428,5246 4428,4862.36 ccw(c4432,4862.36) 4432,4858.36 cw(c4432,4854.36) 4434.83,4857.19 4441.87,4850.15 4441.87,4798.77 cw(c4437.87,4798.78) 4435.04,4795.95 4434.83,4796.16 ccw(c4432,4793.33) 4428,4793.33 4428,3872.67 ccw(c4432,3872.67) 4434.83,3869.84 4435.04,3870.05 cw(c4437.87,3867.23) 4441.87,3867.23 4441.87,3820.85 4434.83,3813.81 cw(c4432,3816.64) 4432,3812.64 ccw(c4432,3808.64) 4428,3808.64 4428,2133 4429,2133 4429,2071 4215,1857 4215,300 3963,48 3963,-55 531,-55 191,285 191,5340 399,5548
  region net CHASSIS_GND: 439.3,5974.13 1826.92,5974.13 1826.92,5726 578,5726 400,5548 399,5548 191,5340 191,285 531,-55 3049.01,-55 3051.01,-56.99 ccw(c3061,-47) 3061,-61.13 3287,-61.13 ccw(c3287,-47) 3296.99,-56.99 3298.99,-55 3560,-55 3560,-344.17 439.3,-344.17 cw(c439.3,-340.17) 438.01,-336.39 ccw(c393.69,-206.7) 530.74,-206.7 ccw(c393.69,-206.7) 256.64,-206.7 ccw(c393.69,-206.7) 349.37,-336.39 cw(c348.07,-340.17) 348.07,-344.17 20,-344.17 20,13.03 cw(c24,13.03) 26.67,16 ccw(c118.1,118.1) 118.1,-18.95 ccw(c118.1,118.1) 118.1,255.15 ccw(c118.1,118.1) 26.67,220.19 cw(c24,223.17) 20,223.17 20,5406.79 cw(c24,5406.79) 26.67,5409.77 ccw(c118.1,5511.86) 118.1,5374.81 ccw(c118.1,5511.86) 118.1,5648.91 ccw(c118.1,5511.86) 26.67,5613.95 cw(c24,5616.93) 20,5616.93 20,5974.13 348.07,5974.13 cw(c348.07,5970.13) 349.37,5966.34 ccw(c393.69,5836.66) 256.64,5836.66 ccw(c393.69,5836.66) 530.74,5836.66 ccw(c393.69,5836.66) 438.01,5966.34 cw(c439.3,5970.13)
  region net CHASSIS_GND: 4179.52,5974.13 4507.6,5974.13 4507.6,5616.93 cw(c4503.6,5616.93) 4500.93,5613.95 ccw(c4409.5,5511.86) 4409.5,5648.91 ccw(c4409.5,5511.86) 4409.5,5374.81 ccw(c4409.5,5511.86) 4500.93,5409.77 cw(c4503.6,5406.79) 4507.6,5406.79 4507.6,223.17 cw(c4503.6,223.17) 4500.93,220.19 ccw(c4409.5,118.1) 4409.5,255.15 ccw(c4409.5,118.1) 4409.5,-18.95 ccw(c4409.5,118.1) 4500.93,16 cw(c4503.6,13.03) 4507.6,13.03 4507.6,-344.17 4179.52,-344.17 cw(c4179.52,-340.17) 4178.23,-336.39 ccw(c4133.91,-206.7) 4270.96,-206.7 ccw(c4133.91,-206.7) 3996.86,-206.7 ccw(c4133.91,-206.7) 4089.59,-336.39 cw(c4088.29,-340.17) 4088.29,-344.17 3963,-344.17 3963,48 4215,300 4215,1857 4429,2071 4429,2133 4428,2133 4428,3767.01 4465.99,3805.01 ccw(c4456,3815) 4470.13,3815 4470.13,4856 ccw(c4456,4856) 4465.99,4865.99 4428,4903.98 4428,5246 4215,5459 4215,5462 3951,5726 3913.54,5726 3913.54,5974.13 4088.29,5974.13 cw(c4088.29,5970.13) 4089.59,5966.34 ccw(c4133.91,5836.66) 3996.86,5836.66 ccw(c4133.91,5836.66) 4270.96,5836.66 ccw(c4133.91,5836.66) 4178.23,5966.34 cw(c4179.52,5970.13) hole: 4462.44,443 4460.69,456.31 4455.55,468.72 4447.37,479.37 4436.72,487.55 4424.31,492.69 4411,494.44 4397.69,492.69 4385.28,487.55 4385.28,487.55 4374.63,479.37 4366.45,468.72 4361.31,456.31 4359.56,443 4361.31,429.69 4366.45,417.28 4374.63,406.63 4385.28,398.45 4385.28,398.45 4397.69,393.31 4411,391.56 4424.31,393.31 4436.72,398.45 4447.37,406.63 4455.55,417.28 4460.69,429.69 4462.44,443
  region net 12V_START1: 3069,173 3069,60 3083,46 3083,2 3091,-6 3125,-6 3135,4 3135,45 3132,48 3126,54 3111,54 3081,84 3081,173 3078,176 3072,176
  text "L4" at 4095,5421.5 h35
Multi-Layer:
  lines w1: 20,-344.17 20,5974.13 ; 20,-344.17 4507.6,-344.17 ; 20,-344.17 20,5974.13 ; 20,-344.17 4507.6,-344.17 ; 20,5974.13 4507.6,5974.13 ; 20,5974.13 4507.6,5974.13 ; 4507.6,-344.17 4507.6,5974.13 ; 4507.6,-344.17 4507.6,5974.13

## Silkscreen, mask and mechanical layers (free items; w line width, h text height)
DESIGN_OUTLINE:
  lines w1: 0,-364.17 4527.6,-364.17 4527.6,5994.13 0,5994.13 0,-364.17
  lines w15: -17699.9,-1047.25 -16949.9,-1047.25 ; -17699.9,4452.75 -16949.9,4452.75 ; -17699.9,9952.75 -16949.9,9952.75 ; -13699.9,-6397.25 -13699.9,-6047.25 ; -13699.9,14952.75 -13699.9,15302.75 ; -9449.9,-6397.25 -9449.9,-6047.25 ; -9449.9,14952.75 -9449.9,15302.75 ; -5199.9,-6397.25 -5199.9,-6047.25 ; -5199.9,14952.75 -5199.9,15302.75 ; -949.9,-6397.25 -949.9,-6047.25 ; -949.9,14952.75 -949.9,15277.75 ; 3300.1,-6397.25 3300.1,-6047.25 ; 3300.1,14952.75 3300.1,15302.75 ; 7550.1,-6397.25 7550.1,-6047.25 ; 7550.1,14952.75 7550.1,15302.75 ; 11800.1,-6397.25 11800.1,-6047.25 ; 11800.1,14952.75 11800.1,15302.75 ; 15050.1,-1047.25 15800.1,-1047.25 ; 15050.1,4452.75 15800.1,4452.75 ; 15050.1,9952.75 15800.1,9952.75 ; -17949.9,-6547.25 16050.1,-6547.25 16050.1,15452.75 -17949.9,15452.75 -17949.9,-6547.25
  lines w30: -16949.9,-6047.25 -16949.9,14952.75 15050.1,14952.75 15050.1,-6047.25 -16949.9,-6047.25
  text "8" at -15924.9,15077.75 h250
  text "7" at -11674.9,15077.75 h250
  text "6" at -7424.9,15077.75 h250
  text "5" at -3174.9,15077.75 h250
  text "4" at 1075.1,15077.75 h250
  text "3" at 5325.1,15077.75 h250
  text "2" at 9550.1,15077.75 h250
  text "1" at 13825.1,15077.75 h250
  text "D" at -17549.9,12702.75 h250
  text "D" at 15450.1,12702.75 h250
  text "C" at -17549.9,7202.75 h250
  text "C" at 15353.1,6487.75 h250
  text "B" at -17549.9,1727.75 h250
  text "B" at 15450.1,1702.75 h250
  text "A" at 15450.1,-3772.25 h250
  text "A" at -17549.9,-3797.25 h250
  text "8" at -15899.9,-6397.25 h250
  text "7" at -11674.9,-6397.25 h250
  text "6" at -7424.9,-6397.25 h250
  text "5" at -3174.9,-6397.25 h250
  text "4" at 1075.1,-6397.25 h250
  text "3" at 5325.1,-6397.25 h250
  text "CAD" at 6700.1,-6397.25 h188
  text "DATA" at 7700.1,-6397.25 h188
  text "2" at 9575.1,-6397.25 h250
  text "DO NOT MANUALLY" at 10600.1,-6397.25 h188
  text "1" at 13825.1,-6397.25 h250
  text "UPDATE" at 14375.1,-6397.25 h188
DIMENSION:
  drawing of 200 lines, arcs and shapes, not listed
NCLEGEND-1-4:
  circle w1: c8138.5,4445 r19.68
  circle w1: c8138.5,3445 r47.24
  circle w1: c8138.5,3945 r19.68
  circle w1: c8138.5,3695 r62.99
  lines w1: 7689,3570 14664,3570 ; 7689,3820 14664,3820 ; 7689,4070 14664,4070 ; 7689,4320 14664,4320 ; 7689,4570 14664,4570 ; 7689,4820 14664,4820 ; 7689,5070 14664,5070 ; 7689,5320 14664,5320 ; 8588,3320 8588,5070 ; 10603,3320 10603,5070 ; 12618,3320 12618,5070 ; 13889,3320 13889,5070 ; 7689,3320 7689,5570 14664,5570 14664,3320 7689,3320 ; 8116.85,4173.35 8138.5,4216.65 8160.15,4173.35 8116.85,4173.35 ; 8132.5,4689 8144.5,4689 8144.5,4701 8132.5,4701 8132.5,4689
  text "DRILL CHART: TOP to BOTTOM" at 9876.5,5382.5 h125
  text "ALL UNITS ARE IN MILS" at 10126.5,5132.5 h125
  text "FIGURE" at 7838.5,4882.5 h125
  text "FINISHED_SIZE" at 8945.5,4882.5 h125
  text "TOLERANCE_DRILL" at 10860.5,4882.5 h125
  text "PLATED" at 12953.5,4882.5 h125
  text "QTY" at 14126.5,4882.5 h125
  text "12.0" at 9395.5,4632.5 h125
  text "+3.0/-3.0" at 11160.5,4632.5 h125
  text "PLATED" at 12953.5,4632.5 h125
  text "137" at 14126.5,4632.5 h125
  text "39.37" at 9345.5,4382.5 h125
  text "+3.0/-3.0" at 11160.5,4382.5 h125
  text "PLATED" at 12953.5,4382.5 h125
  text "24" at 14176.5,4382.5 h125
  text "43.307" at 9295.5,4132.5 h125
  text "+3.0/-3.0" at 11160.5,4132.5 h125
  text "PLATED" at 12953.5,4132.5 h125
  text "18" at 14176.5,4132.5 h125
  text "47.244" at 9295.5,3882.5 h125
  text "+3.0/-3.0" at 11160.5,3882.5 h125
  text "PLATED" at 12953.5,3882.5 h125
  text "4" at 14226.5,3882.5 h125
  text "125.984" at 9245.5,3632.5 h125
  text "+3.0/-3.0" at 11160.5,3632.5 h125
  text "PLATED" at 12953.5,3632.5 h125
  text "8" at 14226.5,3632.5 h125
  text "125.984" at 9245.5,3382.5 h125
  text "+2.0/-2.0" at 11160.5,3382.5 h125
  text "NON-PLATED" at 12753.5,3382.5 h125
  text "2" at 14226.5,3382.5 h125
DXF_20210528-01:
  drawing of 1150 lines, arcs and shapes, not listed
DXF_CR_0129:
  drawing of 227 lines, arcs and shapes, not listed
FAB_NOTES_SHT2:
  lines w1: 6831,8743 8311,8743 ; 6850,9268 6850,8793 ; 6860,10400 8340,10400 ; 6868,9982 6868,10345.75 ; 6850,8793 6825,8943 6875,8943 6850,8793 ; 6843,10222 6868,10372 6893,10222 6843,10222
  lines w10: 8403,8550 8478,8550 ; 8403,10575 8478,10575 ; 8528,8550 8603,8550 ; 8528,10575 8603,10575 ; 8653,8550 8728,8550 ; 8653,10575 8728,10575 ; 8778,8550 8853,8550 ; 8778,10575 8853,10575 ; 8903,8550 8978,8550 ; 8903,10575 8978,10575 ; 9004,11108 9004,10911 9115,10911 ; 9028,8550 9103,8550 ; 9028,10575 9103,10575 ; 9153,8550 9228,8550 ; 9153,10575 9228,10575 ; 9174,10911 9174,11075 9202,11108 9257,11108 9285,11075 9285,10911 ; 9174,11009 9285,11009 ; 9278,8550 9353,8550 ; 9278,10575 9353,10575 ; 9344,11108 9400,11009 ; 9400,10911 9400,11009 ; 9403,8550 9478,8550 ; 9403,10575 9478,10575 ; 9455,11108 9400,11009 ; 9514,11009 9597,11009 ; 9528,8550 9603,8550 ; 9528,10575 9603,10575 ; 9625,10911 9514,10911 9514,11108 9625,11108 ; 9653,8550 9728,8550 ; 9653,10575 9728,10575 ; 9684,10911 9684,11108 9767,11108 9795,11075 9795,11042 9767,11009 9684,11009 ; 9712,11009 9795,10911 ; 9778,8550 9853,8550 ; 9778,10575 9853,10575 ; 10051,10979 10079,10946 10134,10946 10162,10979 10162,11012 10134,11044 10079,11044 10051,11077 10051,11110 10079,11143 10134,11143 10162,11110 ; 10221,11143 10332,11143 ; 10277,10946 10277,11143 ; 10391,10946 10391,11110 10419,11143 10474,11143 10502,11110 10502,10946 ; 10391,11044 10502,11044 ; 10672,10979 10644,10946 10589,10946 10561,10979 10561,11110 10589,11143 10644,11143 10672,11110 ; 10731,10946 10731,11143 ; 10842,10946 10731,11044 10842,11143 ; 10901,11044 11012,11044 ; 11071,11143 11071,10979 11099,10946 11154,10946 11182,10979 11182,11143 ; 11241,10946 11241,11143 11324,11143 11352,11110 11352,11077 11324,11044 11241,11044 ; 8403,8750 9853,8750 9853,8800 8403,8800 8403,8750 ; 8403,8950 9853,8950 9853,9000 8403,9000 8403,8950 ; 8403,9125 9853,9125 9853,9275 8403,9275 8403,9125 ; 8403,9375 9853,9375 9853,9425 8403,9425 8403,9375 ; 8403,9525 9853,9525 9853,9675 8403,9675 8403,9525 ; 8403,9775 9853,9775 9853,9825 8403,9825 8403,9775 ; 8403,9925 9853,9925 9853,10075 8403,10075 8403,9925 ; 8403,10175 9853,10175 9853,10225 8403,10225 8403,10175 ; 8403,10350 9853,10350 9853,10400 8403,10400 8403,10350
DETAILS:
  drawing of 3706 lines, arcs and shapes, not listed
FILM_LABEL_OUTLINE:
  lines w10: 248.1,-1835.25 4403.1,-1835.25 ; 248.1,-1635.25 4403.1,-1635.25 ; 248.1,-1435.25 4403.1,-1435.25 ; 248.1,-1243.25 4403.1,-1243.25 ; 248.1,-2035.25 4403.1,-2035.25 4403.1,-1083.25 248.1,-1083.25 248.1,-2035.25
  text "EMBITEL" at 1926.5,-1210 h100
  text "14-09-2021" at 803.1,-1383.25 h100
  text "EMBL51745" at 3353.1,-1383.25 h100
  text "DATE:" at 293.1,-1388.25 h100
  text "JOB NUMBER:" at 2243.1,-1388.25 h100
  text "DESIGNED AT:SIENNA ECAD TECHNOLOGIES" at 293.1,-1588.25 h100
  text "PCB_SB_V2.1" at 2103.1,-1783.25 h100
  text "2.1" at 4053.1,-1783.25 h100
  text "PART NO/CARD REF:" at 293.1,-1788.25 h100
  text "REV:" at 3633.1,-1788.25 h100
  text "FILM LAYER:" at 293.1,-1973.25 h100
FAB_TEXT:
  lines w6: -16599.18,4096.26 -6178.18,4096.26 ; -16596.62,4099.38 -16596.62,5480.36 -6181.62,5480.36 ; -16593.38,4927.44 -6180.38,4927.44 ; -16587.4,4522.75 -6176.4,4522.75 ; -14491.67,5480.76 -14488.72,4095.32 ; -13763.15,4097.05 -13762.56,4096.46 ; -11621.67,5465.76 -11618.72,4095.32 ; -8766.68,5455.76 -8763.72,4097.33 ; -6180.48,5477.13 -6177.52,4096.7
  text "SINGLE ENDED" at -12049.9,5627.75 h125
  text "IMPEDANCE +/-10%" at -8501.4,5161.08 h125
  text "CONDUCTOR WIDTH" at -14084.4,5136.08 h125
  text "REFERENCE LAYER" at -11099.4,5136.08 h125
  text "LAYER NO." at -16169.88,5130.77 h125
  text "50-ohm +/-10%" at -8501.4,4686.08 h125
  text "8.260 MILS" at -13459.4,4661.08 h125
  text "LAYER 1" at -16169.88,4655.77 h125
  text "2" at -10374.4,4636.08 h125
  text "50-ohm +/-10%" at -8501.4,4286.08 h125
  text "8.260 MILS" at -13459.4,4261.08 h125
  text "LAYER 4" at -16169.88,4255.77 h125
  text "3" at -10374.4,4236.08 h125
TITLE_BLOCK:
  lines w15: 7425.1,-5297.25 9925.1,-5297.25 ; 9930.1,-5797.25 15050.1,-5797.25 ; 9930.1,-5297.25 15050.1,-5297.25 ; 9930.1,-4177.25 15050.1,-4177.25 ; 10310.1,-5797.25 10310.1,-5297.25 ; 10920.1,-6047.25 10920.1,-5797.25 ; 13300.1,-6047.25 13300.1,-5797.25 ; 14525.67,-5792.87 14525.67,-5292.87 ; 7925.1,-4372.25 8175.1,-4372.25 8175.1,-4122.25 7925.1,-4122.25 7925.1,-4372.25 ; 8900.1,-4372.25 9150.1,-4372.25 9150.1,-4122.25 8900.1,-4122.25 8900.1,-4372.25
  lines w30: 7430.1,-6047.25 7430.1,-3547.25 9950.1,-3547.25 ; 9930.1,-6047.25 9930.1,-5797.25 9930.1,-5297.25 ; 9930.1,-5307.25 9930.1,-4177.25 ; 9930.1,-4197.25 9930.1,-3547.25 15050.1,-3547.25
FAB_NOTES:
  lines w1: -938.6,13257.85 -12.5,13257.85 ; -921.9,13287.85 -61.1,13287.85 ; -905.1,13317.85 -424.7,13317.85 ; -888.4,13347.95 -449.7,13347.95 ; -871.8,13377.85 -713,13377.85 ; -855.1,13407.95 -732,13407.85 ; -838.4,13437.85 -730.2,13437.85 ; -821.7,13467.85 -723.6,13467.85 ; -805,13497.85 -714.1,13497.85 ; -788.3,13527.85 -701.3,13527.95 ; -771.5,13557.85 -684.8,13557.85 ; -754.8,13587.85 -663.9,13587.85 ; -738.1,13617.85 -637.6,13617.85 ; -733.3,13415.15 ccw(c-678.34,13420.91) -643.7,13377.85 ; -733.3,13415.35 cw(c-398.44,13380.87) -621.1,13633.35 -696.1,13693.35 -951.1,13235.35 23.9,13235.35 -291.1,13430.35 -366.1,13333.35 ; -721.5,13647.85 -639.3,13647.85 ; -704.7,13677.95 -676.8,13677.95 ; -657.1,13737.35 -560.1,13737.35 ; -654.1,13768.35 -533.1,13768.35 ; -637.1,13798.35 -495.1,13798.35 ; -636.3,13407.85 -431.9,13407.85 ; -625.8,13437.95 -407.8,13437.85 ; -621.1,13828.35 -434.1,13828.35 ; -619.1,13708.35 -580.1,13708.35 ; -612,13467.85 -371.8,13467.85 ; -604.1,13858.35 -241.1,13858.35 ; -594.2,13497.75 -392.8,13497.75 ; -588.1,13888.35 -256.1,13888.35 ; -572.1,13917.35 -270.1,13917.35 ; -571.6,13527.85 -437.7,13527.95 ; -555.1,13948.35 -285.1,13948.35 ; -543.1,13557.85 -482.3,13557.85 ; -538.1,13978.35 -299.1,13978.35 ; -523.1,14007.35 -314.1,14007.35 ; -506.1,14037.35 -328.1,14037.35 ; -489.1,14068.35 -343.1,14068.35 ; -473.1,14097.35 -357.1,14097.35 ; -463.6,13617.95 cw(c-394.2,13561.13) -314.1,13520.75 -463.6,13617.85 -325,13617.85 ; -456.1,14128.35 -371.1,14128.35 ; -439.1,14158.35 -386.1,14158.35 ; -423.1,14187.35 -400.1,14187.35 ; -417.4,13587.85 -308.8,13587.85 ; -416.9,13647.85 -371.9,13647.95 ; -384.6,13317.85 -109.5,13317.85 ; -371.2,13557.85 -304.8,13557.85 ; -366.2,13333.25 cw(c-404.66,13360.56) -448.5,13377.95 ; -359.2,13475.45 ccw(c-255.2,13290.55) -448.5,13377.95 ; -359.1,13475.35 -516.1,13580.35 ccw(c-315.74,13312.64) -643.7,13377.85 ; -355,13347.85 -157.9,13347.85 ; -331.5,13377.95 -206.6,13377.95 ; -325,13527.85 -311.2,13527.85 ; -308.4,13407.85 -254.8,13407.85 ; -265.1,13827.35 -227.1,13827.35 ; -238.1,13497.85 -70.6,13497.85 ; -229.6,13467.85 -56.1,13467.85 ; -185.6,13527.85 -85.1,13527.85 ; -184.1,13437.85 -41.6,13437.85 ; -137.1,13407.85 -27.1,13407.85 ; -91.6,13377.85 -12.6,13377.85 ; -45.1,13347.85 1.9,13347.85 ; 0.9,13317.85 16.4,13317.85 ; -643.7,13377.85 -448.5,13377.95 ; -666.1,13745.35 -411.1,14210.35 -216.1,13805.35 ccw(c-349.7,13576.89) -591.1,13685.35 -666.1,13745.35 ; -253.6,13483.35 cw(c-123.67,13358.85) -88.6,13535.35 23.9,13302.85 -253.6,13483.35
L2:
  text "LAYER 2_PWR" at 1490.5,-1982.33 h100
L3:
  text "LAYER 3_GND" at 1464.5,-1979.33 h100
ARE:
  text "ESWAR" at 3173.1,-672.25 h35
L1:
  text "PRIMARY SIDE" at 1553.1,-1973.25 h100
FAB:
  text "FABRICATION LAYER" at 1413.1,-1973.25 h100
SMSE:
  text "SOLDERMASK SECONDARY SIDE" at 1413.1,-1973.25 h100
SMPR:
  text "SOLDERMASK PRIMARY SIDE" at 1413.1,-1973.25 h100
SPSE:
  text "SOLDER PASTE SECONDARY SIDE" at 1413.1,-1973.25 h100
SPPR:
  text "SOLDER PASTE PRIMARY SIDE" at 1413.1,-1973.25 h100
SLSE:
  text "SILKSCREEN SECONDARY SIDE" at 1413.1,-1973.25 h100
SLPR:
  text "SILKSCREEN PRIMARY SIDE" at 1413.1,-1973.25 h100
ASSE:
  text "ASSEMBLY SECONDARY SIDE" at 1413.1,-1973.25 h100
ASPR:
  text "ASSEMBLY PRIMARY SIDE" at 1413.1,-1973.25 h100
L4:
  text "SECONDARY SIDE" at 1553.1,-1973.25 h100
TITLE_DATA:
  text "UNLESS OTHERWISE SPECIFIED" at 7650.1,-3822.25 h80
  text "SIENNA ECAD Technologies" at 10275.1,-3922.25 h175
  text "ALL DIMENSIONS ARE IN" at 7650.1,-3964.25 h80
  text "DRAWING TITLE" at 10050.1,-4347.25 h80
  text "X" at 8926,-4357.5 h225
  text "INCHES" at 7825.1,-4522.25 h80
  text "MILLIMETERS" at 8700.1,-4547.25 h80
  text "REV" at 14665.26,-5434.13 h80
  text "SIZE" at 9975.1,-5447.25 h80
  text "PART NUMBER" at 10450.1,-5447.25 h80
  text "DATE" at 8450.1,-5622.25 h80
  text "D" at 10067.7,-5697.25 h156
  text "14/09/2021" at 8107.9,-5895.76 h100
  text "1  OF" at 14152.1,-5956.25 h80
  text "1" at 14722.6,-5957.25 h80
  text "SCALE" at 10000.1,-5972.25 h80
  text "1/1" at 10475.1,-5972.25 h80
  text "SHEET" at 13425.1,-5972.25 h80
REVISION_DATA:
  text "2.1" at 14566.01,-5703.23 h156
DRAWING_ORIGIN:
  lines w1: -25,0 25,0 ; 0,-25 0,25

## Text inside footprints (layer, text, board x,y; h text height)
C1: PIN_NUMBER "2" at 3101.37,3662.45 h11.81 r90; PIN_NUMBER "1" at 3101.37,3701.04 h11.81 r90; DIMENSION "41.34" at 3036.21,3713.24 h11.81 r90; DIMENSION "1.05" at 3012.59,3707.34 h11.81 r90; DIMENSION "21.65" at 3112.99,3581.35 h11.81 r90; DIMENSION "0.55" at 3089.36,3575.45 h11.81 r90; DIMENSION "31.50" at 3211.41,3709.3 h11.81 r90; DIMENSION "0.8" at 3187.79,3697.49 h11.81 r90; FP_NAME "CAPC1005X55N_A" at 2815.52,3667.97 h31.5 r90; PAD_STACK_NAME "R55_62" at 3255.7,3760.49 h31.5 r90
C2: PIN_NUMBER "1" at 3458.38,3770.46 h11.81 r270; PIN_NUMBER "2" at 3458.38,3809.04 h11.81 r270; DIMENSION "41.34" at 3532.98,3758.25 h11.81 r270; DIMENSION "1.05" at 3556.6,3764.16 h11.81 r270; DIMENSION "21.65" at 3456.21,3890.14 h11.81 r270; DIMENSION "0.55" at 3479.83,3896.05 h11.81 r270; DIMENSION "31.50" at 3357.78,3762.19 h11.81 r270; DIMENSION "0.8" at 3381.41,3774 h11.81 r270; FP_NAME "CAPC1005X55N_A" at 3400.87,3803.53 h31.5 r270; PAD_STACK_NAME "R55_62" at 3313.49,3711.01 h31.5 r270
C3: PIN_NUMBER "1" at 3514.52,3759.25 h11.81 r270; PIN_NUMBER "2" at 3514.52,3822.24 h11.81 r270; DIMENSION "62.99" at 3417.81,3761.49 h11.81 r270; DIMENSION "1.6" at 3441.43,3773.3 h11.81 r270; DIMENSION "41.34" at 3513.75,3881.76 h11.81 r270; DIMENSION "1.05" at 3537.37,3887.66 h11.81 r270; DIMENSION "72.83" at 3600.65,3761.62 h11.81 r270; DIMENSION "1.85" at 3624.28,3767.53 h11.81 r270; FP_NAME "CAPC1608X80N_A" at 3473.57,3786.91 h31.5 r270; PAD_STACK_NAME "R100_105" at 3374.65,3673.28 h31.5 r270
C4: PIN_NUMBER "1" at 1193.38,4829.46 h11.81 r270; PIN_NUMBER "2" at 1193.38,4868.04 h11.81 r270; DIMENSION "41.34" at 1267.98,4817.25 h11.81 r270; DIMENSION "1.05" at 1291.6,4823.16 h11.81 r270; DIMENSION "21.65" at 1191.21,4949.14 h11.81 r270; DIMENSION "0.55" at 1214.83,4955.05 h11.81 r270; DIMENSION "31.50" at 1092.79,4821.19 h11.81 r270; DIMENSION "0.8" at 1116.41,4833 h11.81 r270; FP_NAME "CAPC1005X55N_A" at 1135.87,4862.53 h31.5 r270; PAD_STACK_NAME "R55_62" at 1048.49,4770.01 h31.5 r270
C5: PIN_NUMBER "1" at 1252.37,4823.19 h11.81 r270; PIN_NUMBER "2" at 1252.37,4878.31 h11.81 r270; DIMENSION "55.12" at 1141.4,4822.27 h11.81 r270; DIMENSION "1.4" at 1165.02,4834.08 h11.81 r270; DIMENSION "35.43" at 1244.48,4983.47 h11.81 r270; DIMENSION "0.9" at 1268.11,4995.28 h11.81 r270; DIMENSION "66.93" at 1355.42,4823.61 h11.81 r270; DIMENSION "1.7" at 1379.05,4835.43 h11.81 r270; FP_NAME "CAPC1608X90N_A" at 1226.98,4854.68 h31.5 r270; PAD_STACK_NAME "S90" at 1104.2,4809.43 h31.5 r270
C6: PIN_NUMBER "1" at 1259.53,4086.63 h11.81 r90; PIN_NUMBER "2" at 1259.53,4027.57 h11.81 r90; DIMENSION "59.06" at 1394.17,4087.77 h11.81 r90; DIMENSION "1.5" at 1370.55,4075.96 h11.81 r90; DIMENSION "37.80" at 1279.37,3895.37 h11.81 r90; DIMENSION "0.96" at 1255.75,3889.46 h11.81 r90; DIMENSION "68.90" at 1172.6,4088.32 h11.81 r90; DIMENSION "1.75" at 1148.98,4082.41 h11.81 r90; FP_NAME "CAPC1608X90N" at 958.16,4063.36 h31.5 r90; PAD_STACK_NAME "R80_75" at 1440.74,4134.13 h31.5 r90
C7: PIN_NUMBER "1" at 2834.56,4285 h11.81; PIN_NUMBER "2" at 2795.98,4285 h11.81; DIMENSION "41.34" at 2851.49,4354.88 h11.81; DIMENSION "1.05" at 2845.59,4378.51 h11.81; DIMENSION "21.65" at 2719.6,4278.11 h11.81; DIMENSION "0.55" at 2713.7,4301.73 h11.81; DIMENSION "31.50" at 2847.56,4179.69 h11.81; DIMENSION "0.8" at 2835.75,4203.31 h11.81; FP_NAME "CAPC1005X55N_A" at 2629.82,4399.18 h31.5; PAD_STACK_NAME "R55_62" at 2898.74,4135.4 h31.5